# Altium PCB Power_Board-V1.0.PcbDoc (part 4 of 4)
Units mm, origin at the board's own origin, x right, y up, seen from the top; angles counter-clockwise.
Board outline 64.6 x 83.5 mm, 4 copper layers (Top Layer, GND1, GND2, Bottom Layer), stack 0.603 mm thick; 188 components, 131 nets, 487 pads, 123 vias.
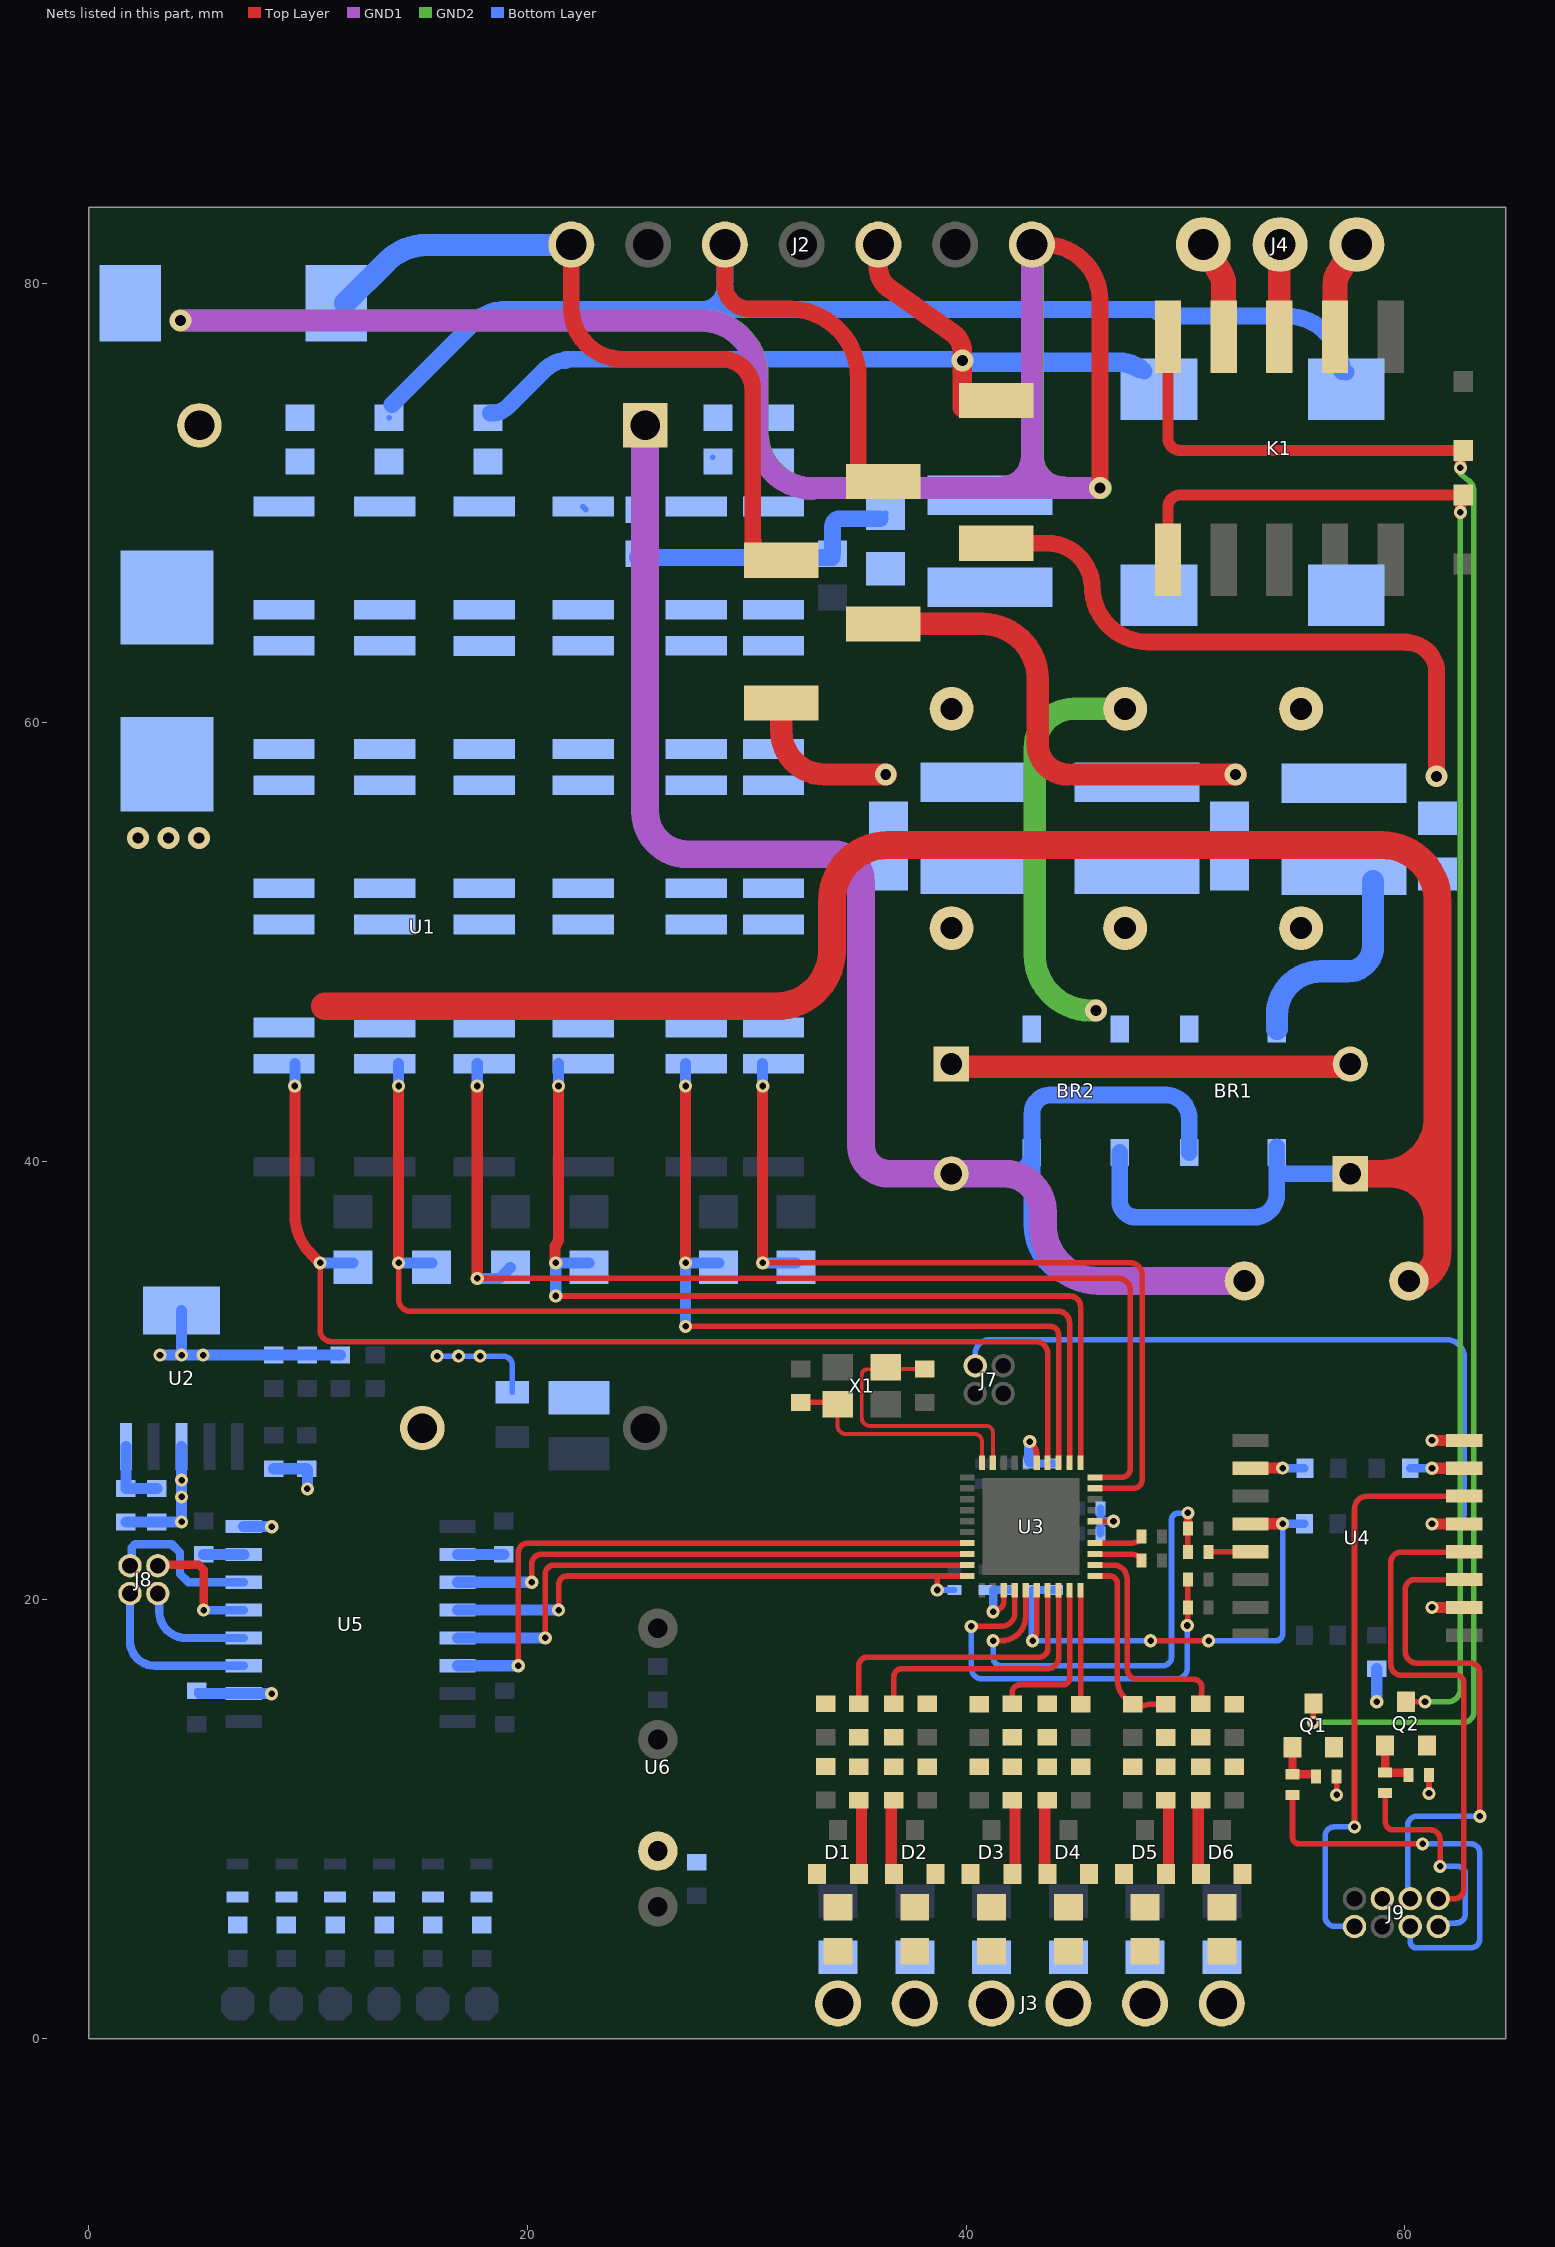
[diagram p4: the nets of this part, all layers, seen from the top]

## Via types
v1: diameter 0.6, hole 0.3, Top Layer to Bottom Layer, tented both sides, 113 vias
v2: diameter 1, hole 0.5, Top Layer to Bottom Layer, tented both sides, 10 vias

## Nets (pads, with @x,y where several pads share a name; then routed paths per layer and width w, separated by ;. In a path a pad name is that pad's centre, name@x,y a point inside that pad or via, vN(x,y) a via of type N, cw(c..) or ccw(c..) an arc to the next point about the centre after c; other vN are vias at no path point) (continued)
ADE_PM1: R15.1 U4.13 | length 1.9
  Top Layer w0.254: R15.1@51.052,22.178 cw(c51.071,22.178) 51.071,22.197 U4.13@52.96,22.197
AVDD: C34.2 C35.2 U3.25 | length 2.7
  Top Layer w0.254: v1@43.1,27.001 cw(c42.533,26.62) 43.216,26.62 U3.25@43.216,26.247
  Bottom Layer w0.381: C35.2@42.9,26.223 C34.2@43.997,26.223
  Bottom Layer w0.508: C35.2@42.899,26.357 v1(42.899,27.22)
COM: J4.2 K1.3 | length 3.9
  Top Layer w1.016: K1.3@54.279,77.823 J4.2@54.279,81.765
DVDD: C32.2 C33.2 U3.3 | length 3.1
  Top Layer w0.254: v1(41.231,19.46) 41.474,19.564 ccw(c41.319,19.929) 41.716,19.929 U3.3@41.716,20.432
  Bottom Layer w0.178: 41.231,20.401 cw(c41.284,20.401) 41.284,20.454
  Bottom Layer w0.381: v1(41.231,19.46) 41.231,20.401 41.231,20.464 41.96,20.464 C33.2@41.97,20.454
GND: C5.1 C6.1 C9.1 C10.1 C11.1 C12.1 C13.1 C14.1 C15.1 C30.1 C62.1 J9.3 Q1.2 Q2.2 R11.1 R90.1 R91.1 U1.3 U2.3 U2.6 U4.2 U4.8 U5.2 U5.8 U6.2 | length 34.5
  Top Layer w0.254: v1(56.89,11.112) R90.1@56.89,11.956 ; v1(61.102,11.18) R91.1@61.102,12.024
  Top Layer w0.508: v1(61.239,19.657) U4.2@62.71,19.657 ; v1(61.239,27.277) U4.8@62.71,27.277
  Bottom Layer w0.254: C30.1@4.92,15.854 ccw(c5.047,15.854) C30.1@5.047,15.727 ; U5.8@7.061,23.347 U5.8@7.065,23.344 ; v1@8.334,23.344 v1(8.338,23.34) ; v1@15.888,31.115 v1(16.859,31.115) ; v1@16.808,31.166 ccw(c16.859,31.166) v1(16.859,31.115) ; C5.1@19.304,29.464 19.304,30.705 ccw(c18.894,30.705) 18.894,31.115 v1(17.84,31.115) v1(16.859,31.115)
  Bottom Layer w0.508: C14.1@1.686,23.557 R11.1@3.098,23.557 v1(4.226,23.557) U2.3@4.226,26.996 ; v1(3.245,31.166) v1(4.226,31.166) ; U2.6@4.226,33.196 v1(4.226,31.166) ; C30.1@5.047,15.727 U5.2@7.061,15.727 v1@8.331,15.727 ; U5.8@7.065,23.344 v1@8.334,23.344 ; C13.1@8.424,25.981 C12.1@9.931,25.981 9.967,25.945 v1(9.967,25.062) ; C10.1@11.472,31.166 C11.1@9.948,31.166 C9.1@8.424,31.166 v1(5.207,31.166) v1(4.226,31.166) ; v1(58.724,15.357) C15.1@58.724,16.863
  other v1: 8.334,15.724 4.226,24.7 4.226,25.462 15.878,31.115
HV_DC: BR1.1 BR2.1 C2.1 C3.2 J1.2 | length 101.3
  Top Layer w0.254: C3.2@59.621,34.544 C3.2@60.188,34.544
  Top Layer w1.27: 10.769,47.069 31.343,47.069 ccw(c31.343,49.609) 33.883,49.609 ; 33.883,49.484 33.883,51.829 ; 33.883,51.879 cw(c36.423,51.879) 36.423,54.419 58.953,54.419 cw(c58.953,51.879) 61.493,51.879 ; C2.1@57.526,39.268 C2.1@57.513,39.433 58.953,39.433 ; C3.2@60.188,34.544 ccw(c60.188,35.85) 61.493,35.85 61.493,37.282 ; 61.493,51.829 61.493,41.973 ; 58.953,39.433 ccw(c58.953,41.973) 61.493,41.973 ; 58.953,39.433 59.342,39.433 cw(c59.342,37.282) 61.493,37.282 ; 61.493,37.282 61.493,41.973
  Bottom Layer w0.254: 54.168,39.457 ccw(c54.192,39.457) 54.192,39.433
  Bottom Layer w0.762: BR2.1@47,40.399 47,38.2 ccw(c47.75,38.2) 47.75,37.45 53.122,37.45 ccw(c53.122,38.496) 54.168,38.496 54.168,39.457 BR1.1@54.168,40.399 BR1.1@54.168,40.649 ; 54.192,39.433 C2.1@57.513,39.433
  other v2: 2.233,54.737 3.63,54.737 5.027,54.737
HVGND: BR1.4 BR2.4 C3.1 C7.2 U1.1 | length 94.9
  GND1 w1.27: U1.1@25.364,73.556 25.364,55.936 ccw(c27.301,55.936) 27.301,53.999 33.938,53.999 cw(c33.938,52.729) 35.208,52.729 35.208,40.703 ccw(c36.478,40.703) 36.478,39.433 41.742,39.433 cw(c41.742,37.675) 43.5,37.675 43.5,37.084 ccw(c46.04,37.084) 46.04,34.544 C3.1@52.963,34.544
  Bottom Layer w0.762: C7.2@39.321,39.433 42.034,39.433 ; 49.105,43.02 cw(c49.105,41.957) 50.168,41.929 BR1.4@50.168,40.399 ; 49.13,43.02 43.835,43.02 ccw(c43.835,42.185) 43,42.185 BR2.4@43,40.399 ; C3.1@52.963,34.544 45.54,34.544 cw(c45.54,37.084) 43,37.084 43,38.467 ; 42.034,39.433 ccw(c42.034,40.399) BR2.4@43,40.399 ; 42.034,39.433 cw(c42.034,38.467) 43,38.467 ; 43,38.467 BR2.4@43,40.399
IA_N: FB4.1 J3.2 R37.1
IA_P: FB2.1 J3.1 R30.2
IAN: C45.1 R39.2 U3.8 | length 12.3
  Top Layer w0.254: R39.2@36.707,15.263 36.707,16.5 cw(c37.07,16.5) 37.07,16.863 43.692,16.863 ccw(c43.692,17.386) 44.216,17.386 U3.8@44.216,20.432
IAP: C42.2 R29.2 U3.7 | length 13.4
  Top Layer w0.254: R29.2@35.107,15.263 35.107,17 cw(c35.503,17) 35.503,17.396 43.34,17.396 ccw(c43.34,17.772) 43.716,17.772 U3.7@43.716,20.432
IB_N: FB7.1 J3.4 R48.1
IB_P: FB5.1 J3.3 R47.2
IBN: C50.1 R50.2 U3.10 | length 5.2
  Top Layer w0.254: C50.1@45.216,15.249 U3.10@45.216,20.432
IBP: C48.2 R45.2 U3.9 | length 7.4
  Top Layer w0.254: R45.2@42.107,15.263 42.107,15.79 cw(c42.443,15.79) 42.443,16.126 44.408,16.126 ccw(c44.408,16.434) 44.716,16.434 U3.9@44.716,20.349
IC_N: FB11.1 J3.6 R60.1
IC_P: FB9.1 J3.5 R59.2
ICN: C55.1 R66.2 U3.12 | length 10.6
  Top Layer w0.254: U3.12@45.873,21.59 46.718,21.59 cw(c46.718,20.969) 47.339,20.969 47.339,16.866 ccw(c47.826,16.866) 47.826,16.379 50.369,16.379 50.371,16.379 cw(c50.37,16.001) 50.746,15.961 50.744,15.936 R66.2@50.707,15.263
ICP: C53.2 R58.2 U3.11 | length 8.8
  Top Layer w0.254: U3.11@45.873,21.09 46.542,21.09 cw(c46.542,20.737) 46.894,20.737 46.894,16.351 46.894,16.344 ccw(c47.976,16.334) 47.242,15.539 47.281,15.503 C53.2@47.976,15.252 ; C53.2@47.64,15.319 47.933,15.144 47.999,15.16 48.353,15.249 R58.2@49.107,15.25
IN_N: 
IN_P: 
INN: R79.1 U3.14 | length 2.3
  Top Layer w0.254: U3.14@45.873,22.59 46.079,22.59 46.831,22.59 47.551,22.59 ccw(c47.551,23.133) 47.891,22.709 R79.1@47.993,22.888
INP: R77.2 U3.13 | length 2.2
  Top Layer w0.254: U3.13@45.873,22.09 47.256,22.09 47.499,22.09 cw(c47.499,21.459) 47.891,21.953 R77.2@47.993,21.79
IRQ0: J9.2 U4.6 | length 26.7
  Top Layer w0.254: v1@57.708,9.673 57.708,24.142 cw(c58.303,24.142) 58.303,24.737 U4.6@62.71,24.737
  Bottom Layer w0.254: J9.2@57.708,5.111 56.804,5.121 56.792,5.122 cw(c56.802,5.549) 56.374,5.549 56.374,9.251 cw(c56.773,9.251) 56.773,9.649 v1(57.708,9.649)
MISO: U3.38 U5.11 | length 24.4
  Top Layer w0.254: v1(20.196,20.807) 20.196,21.637 cw(c20.649,21.637) 20.649,22.09 U3.38@40.058,22.09
  Bottom Layer w0.254: v1@20.069,20.807 ccw(c20.069,20.927) v1@20.189,20.927
  Bottom Layer w0.508: U5.11@16.811,20.807 v1@20.069,20.807
MOSI: U3.39 U5.13 | length 26.1
  Top Layer w0.254: v1(20.807,18.267) 20.807,21.176 cw(c21.221,21.176) 21.221,21.59 39.723,21.59
  Bottom Layer w0.508: U5.13@16.811,18.267 v1(20.807,18.267)
NC: J4.1 K1.2 | length 4.2
  Top Layer w1.143: K1.2@56.819,77.823 56.819,79.996 cw(c57.744,79.996) 56.937,80.448 57.743,81.798 ccw(c56.871,82.319) J4.1@57.744,81.8
NetBR1_2: BR1.2 C1.2 L1.2 R2.2 | length 9.8
  Bottom Layer w1.016: BR1.2@54.168,46.033 54.168,46.658 cw(c56.168,46.658) 56.168,48.658 57.404,48.658 ccw(c57.404,49.801) 58.547,49.801 L1.2@58.547,52.769
NetBR1_3: BR1.3 C4.2 L2.2 R5.2
NetBR2_2: BR2.2 C1.1 C4.1 C8.1 L4.2 R9.2 | length 18.8
  GND2 w1.016: v2(45.925,46.879) 45.665,46.879 cw(c45.665,49.419) 43.125,49.419 43.125,58.825 cw(c44.93,58.825) 44.93,60.63 C4.1@47.25,60.63
NetBR2_3: BR2.3 C8.2 L3.2 R8.2
NetC2_2: C2.2 C7.1 | length 17.3
  Top Layer w1.016: C7.1@39.946,44.308 C2.2@57.275,44.308
NetC14_2: C14.2 R11.2 U2.5 | length 3.3
  Bottom Layer w0.508: U2.5@1.686,26.996 C14.2@1.686,25.081 R11.2@3.098,25.081
NetC28_2: C28.2 U3.30 X1.3 | length 10.7
  Top Layer w0.178: X1.3@34.052,29.004 cw(c34.052,28.916) X1.3@34.14,28.916 34.135,28.916 34.135,27.943 ccw(c34.518,27.951) 34.515,27.568 40.387,27.568 cw(c40.387,27.239) 40.716,27.239 40.716,27.237 U3.30@40.716,26.247
  Top Layer w0.254: C28.2@32.447,29.004 X1.3@34.052,29.004
NetC29_2: C29.2 U3.29 X1.1 | length 12.8
  Top Layer w0.178: C29.2@38.114,30.528 36.428,30.528 cw(c36.428,30.616) X1.1@36.34,30.616 36.241,30.517 35.485,30.517 ccw(c35.485,30.272) 35.24,30.272 35.24,28.315 ccw(c35.617,28.315) 35.617,27.938 40.92,27.938 cw(c40.92,27.643) 41.216,27.644 41.216,27.64 U3.29@41.216,26.247
NetC41_2: C41.2 R28.2 R29.1
NetC44_1: C44.1 R38.2 R39.1
NetC47_2: C47.2 R44.2 R45.1
NetC49_1: C49.1 R49.2 R50.1
NetC52_2: C52.2 R57.2 R58.1
NetC54_1: C54.1 R65.2 R66.1
NetC58_2: 
NetC60_1: 
NetD1_1: D1.1 D1.2 FB2.2 R28.1 | length 3.4
  Top Layer w0.508: R28.1@35.107,10.868 35.23,10.746 D1.2@35.23,7.498
NetD2_1: D2.1 D2.2 FB4.2 R38.1 | length 3.2
  Top Layer w0.508: D2.1@36.585,7.498 R38.1@36.585,10.746
NetD3_1: D3.1 D3.2 FB5.2 R44.1 | length 3.2
  Top Layer w0.508: D3.2@42.23,7.498 R44.1@42.23,10.746
NetD4_1: D4.1 D4.2 FB7.2 R49.1 | length 3.2
  Top Layer w0.508: D4.1@43.584,7.498 R49.1@43.584,10.746
NetD5_1: D5.1 D5.2 FB9.2 R57.1 | length 3.2
  Top Layer w0.508: D5.2@49.23,7.498 R57.1@49.23,10.746
NetD6_1: D6.1 D6.2 FB11.2 R65.1 | length 3.2
  Top Layer w0.508: D6.1@50.585,7.498 R65.1@50.585,10.746
NetD7_1: 
NetD8_1: 
NetFB1_2: FB1.2 R23.1
NetFB3_2: FB3.2 R32.1
NetFB6_2: FB6.2 R40.1
NetFB8_2: FB8.2 R52.1 | length 0.2
  Bottom Layer w0.254: R52.1@22.518,69.85 R52.1@22.661,69.707
NetFB10_2: FB10.2 R61.1
NetFB12_2: FB12.2 R69.1 | length 0
NetJ1_1: J1.1 U1.2
NetL1_1: L1.1 R1.2 R2.1 | length 28.4
  Top Layer w0.762: R1.2@41.368,68.179 43.696,68.179 cw(c43.696,66.125) 45.75,66.125 45.75,66.015 ; 45.75,66.215 ccw(c48.29,66.215) 48.29,63.675 60.077,63.675 ; 60.077,63.65 cw(c60.077,62.264) 61.443,62.496 v2@61.443,57.53
  other v2: 61.447,57.555
NetL2_1: L2.1 R4.2 R5.1 | length 21
  Top Layer w1.016: R4.2@36.22,64.503 40.727,64.503 cw(c40.727,61.963) 43.267,61.963 43.267,59.01 ccw(c44.644,59.01) 44.644,57.633 ; 44.933,57.633 v2(52.29,57.633)
NetL3_1: L3.1 R7.2 R8.1 | length 6.9
  Top Layer w1.016: R7.2@31.571,60.625 31.571,59.605 ccw(c33.537,59.605) 33.537,57.64 36.334,57.64 v2(36.334,57.633)
NetLED1_1: LED1.1 R83.1
NetLED2_1: LED2.1 R84.1
NetLED3_1: LED3.1 R85.1
NetLED4_1: LED4.1 R86.1
NetLED5_1: LED5.1 R87.1
NetLED6_1: LED6.1 R88.1
NetQ1_1: Q1.1 R20.2 R90.2 | length 2.4
  Top Layer w0.381: Q1.1@54.88,13.281 R20.2@54.88,12.052 55.854,12.052 cw(c55.854,11.956) R90.2@55.95,11.956
NetQ2_1: Q2.1 R89.2 R91.2 | length 2.4
  Top Layer w0.381: Q2.1@59.104,13.357 R89.2@59.104,12.128 60.077,12.128 cw(c60.077,12.032) R91.2@60.173,12.032
NetR12_2: R12.2 R13.2 U3.4 | length 19.7
  Top Layer w0.254: v1(40.234,18.796) 41.605,18.796 ccw(c41.605,19.407) 42.216,19.407 U3.4@42.216,20.432 ; v1(50.079,18.835) 50.096,18.851 50.096,19.822 R13.2@50.109,19.835 ; R13.2@50.112,19.835 R12.2@50.112,20.924
  Bottom Layer w0.254: v1(40.234,18.796) 40.234,16.895 ccw(c40.72,16.895) 40.72,16.408 49.603,16.408 ccw(c49.603,16.885) 50.079,16.885 v1(50.079,18.835)
NetR14_2: R14.2 R15.2 U3.5 | length 21.6
  Top Layer w0.254: v1(41.231,18.136) 41.594,18.136 ccw(c41.594,19.258) 42.716,19.258 U3.5@42.716,20.432 ; R15.2@50.112,22.178 R14.2@50.112,23.264
  Top Layer w0.381: R14.2@50.112,23.267 v1(50.112,23.966)
  Bottom Layer w0.254: v1(41.231,18.136) 41.231,17.373 ccw(c41.6,17.373) 41.6,17.003 48.964,17.003 ccw(c48.964,17.401) 49.362,17.401 49.362,23.657 cw(c49.657,23.657) 49.657,23.952 50.112,23.952 v1(50.112,23.966)
NetR18_1: R18.1 U4.7 | length 2.5
  Top Layer w0.508: v1(61.239,26.007) U4.7@62.71,26.007
  Bottom Layer w0.381: R18.1@60.248,26.01 v1@61.239,26.01
NetR19_1: R19.1 U4.10 | length 2.5
  Top Layer w0.178: U4.10@52.96,26.007 U4.10@52.96,26.01
  Top Layer w0.508: U4.10@52.96,26.01 v1(54.431,26.01)
  Bottom Layer w0.381: v1(54.431,26.01) R19.1@55.422,26.01
NetR21_1: R21.1 U5.7 | length 1.8
  Bottom Layer w0.508: R21.1@5.232,22.077 U5.7@7.061,22.077
NetR22_1: R22.1 U5.10 | length 2.1
  Bottom Layer w0.508: U5.10@16.811,22.077 R22.1@18.923,22.077
NetR23_2: R23.2 R24.1
NetR24_2: R24.2 R25.1
NetR25_2: R25.2 R26.1
NetR32_2: R32.2 R33.1
NetR33_2: R33.2 R34.1
NetR34_2: R34.2 R35.1
NetR40_2: R40.2 R41.1
NetR41_2: R41.2 R42.1
NetR42_2: R42.2 R43.1
NetR52_2: R52.2 R53.1
NetR53_2: R53.2 R54.1
NetR54_2: R54.2 R55.1
NetR61_2: R61.2 R62.1
NetR62_2: R62.2 R63.1
NetR63_2: R63.2 R64.1
NetR69_2: R69.2 R70.1
NetR70_2: R70.2 R71.1
NetR71_2: R71.2 R72.1
NEUTRAL: FB3.1 FB8.1 FB12.1 FB15.1 J2.1 L4.1 R9.1 VR1.1 VR2.1 VR3.1 | length 152.6
  Top Layer w0.762: J2.1@43,81.8 J2.1@43.56,81.8 ; J2.1@43.81,81.8 J2.1@43.56,81.8 ; v2(46.1,70.696) 46.1,79.26 ccw(c43.56,79.26) J2.1@43.56,81.8
  GND1 w1.016: v2@4.405,78.334 26.8,78.334 27.916,78.334 cw(c27.916,75.794) 30.456,75.794 30.456,73.065 ; 30.456,73.215 ccw(c32.996,73.215) 32.996,70.675 ; 32.571,70.7 v2@46.1,70.7 ; 41.587,70.719 ccw(c41.587,72.132) 43,72.132 ; 43,70.8 43,72.132 ; J2.1@43,81.8 43,72.132 ; 44.413,70.719 cw(c44.413,72.132) 43,72.132
  GND2 w1.016: v2@4.439,78.334 26.833,78.334 27.95,78.334 cw(c27.95,75.794) 30.49,75.794 30.49,73.065 ; 30.49,73.215 ccw(c33.03,73.215) 33.03,70.675 ; 32.605,70.7 v2@46.134,70.7 ; 41.621,70.719 ccw(c41.621,72.132) 43.034,72.132 ; 43.034,70.8 43.034,72.132 ; J2.1@43.034,81.8 43.034,72.132 ; 44.447,70.719 cw(c44.447,72.132) 43.034,72.132
  Bottom Layer w0.254: R9.1@36.08,69.3 ccw(c36.08,69.548) R9.1@36.328,69.548
  Bottom Layer w0.762: FB8.1@25.019,67.532 FB15.1@33.879,67.532 ; FB15.1@33.908,67.703 33.908,68.958 cw(c34.25,68.958) 34.25,69.3 R9.1@36.08,69.3
  other v2: 4.18,78.334
NO: J4.3 K1.4 | length 4.2
  Top Layer w1.143: J4.3@50.814,81.8 ccw(c51.687,82.319) 50.815,81.798 51.621,80.448 cw(c50.814,79.996) 51.739,79.996 K1.4@51.739,77.823
PM0: J9.5 U4.3 | length 23.2
  Top Layer w0.254: U4.3@62.71,20.927 62.71,20.93 60.46,20.93 ccw(c60.46,20.494) 60.024,20.494 60.024,17.64 ccw(c60.543,17.64) 60.543,17.12 62.995,17.12 cw(c62.995,16.691) 63.424,16.691 v1(63.424,10.135)
  Bottom Layer w0.254: J9.5@60.248,6.381 60.128,6.501 60.128,9.687 cw(c60.554,9.709) 60.554,10.135 v1(63.424,10.135)
PM1: J9.7 U4.4 | length 23
  Top Layer w0.254: J9.7@61.518,6.381 62.258,6.381 62.343,6.381 ; 62.258,6.373 ccw(c62.258,6.805) 62.69,6.805 62.69,16.228 ccw(c62.358,16.228) 62.358,16.561 59.852,16.561 cw(c59.852,17.048) 59.365,17.048 59.365,21.718 cw(c59.821,21.718) 59.821,22.174 62.687,22.174 ccw(c62.687,22.197) U4.4@62.71,22.197
REF: C36.2 C37.2 U3.16 | length 2.6
  Top Layer w0.254: U3.16@45.873,23.59 v1(46.718,23.59)
  Bottom Layer w0.254: C37.2@46.127,24.17 C37.2@46.13,24.17
  Bottom Layer w0.381: C36.2@46.127,23.027 46.127,23.599 ; C37.2@46.127,24.17 46.127,23.599 ; v1(46.718,23.59) 46.718,23.599 46.127,23.599
RESET: J7.2 U4.5 | length 34.2
  Top Layer w0.508: v1@61.239,23.463 U4.5@62.71,23.463
  Bottom Layer w0.254: J7.2@40.414,30.463 40.414,31.214 cw(c41.063,31.214) 41.063,31.863 61.91,31.863 cw(c61.91,31.061) 62.713,31.061 62.713,23.978 cw(c62.195,23.978) 62.195,23.46 61.239,23.46 v1(61.239,23.467)
RESET_ADE: C21.2 R16.1 SB1.2 U3.6 U4.12 | length 24.8
  Top Layer w0.178: U4.12@52.96,23.467 U4.12@52.96,23.47
  Top Layer w0.254: v1(43.028,18.136) ccw(c42.576,18.588) 43.216,18.588 U3.6@43.216,20.432 ; v1(48.412,18.136) v1(51.052,18.136)
  Top Layer w0.508: U4.12@52.96,23.47 v1(54.431,23.47)
  Bottom Layer w0.178: v1(43.028,18.136) v1@43.037,18.136
  Bottom Layer w0.254: v1@43.037,18.136 v1(48.412,18.136) ; v1(51.052,18.136) 54.116,18.136 ccw(c54.116,18.451) 54.431,18.451 v1(54.431,23.47) ; SB1.2@55.422,23.467 SB1.2@55.422,23.47
  Bottom Layer w0.381: v1@43.037,18.136 C21.2@43.037,20.454 R16.1@44.101,20.454 ; v1(54.431,23.47) SB1.2@55.422,23.47
RLY_RSET: J9.8 R89.1 | length 10.2
  Top Layer w0.254: R89.1@59.104,11.189 59.104,9.888 ccw(c59.477,9.888) 59.477,9.515 61.161,9.515 cw(c61.161,9.068) 61.608,9.068 v1(61.608,7.852)
  Bottom Layer w0.254: J9.8@61.518,5.111 61.674,5.267 62.344,5.267 ; v1(61.608,7.852) 62.404,7.852 cw(c62.404,7.493) 62.763,7.493 62.763,5.686 ; 62.345,5.269 ccw(c62.345,5.685) 62.762,5.685
RLY_SET: J9.6 R20.1 | length 19
  Top Layer w0.254: R20.1@54.88,11.112 54.88,9.185 ccw(c55.187,9.185) 55.049,8.911 ccw(c55.187,9.185) 55.187,8.878 v1(60.809,8.878)
  Bottom Layer w0.254: J9.6@60.248,5.111 60.248,4.416 ccw(c60.523,4.416) 60.523,4.14 63.01,4.14 ccw(c63.01,4.549) 63.419,4.549 ; v1(60.809,8.878) 63.006,8.878 cw(c63.006,8.461) 63.424,8.461 63.424,4.572
RSET_COIL: D10.1 K1.6 Q2.3 | length 73
  Top Layer w0.254: Q2.3@60.054,15.357 v1(60.921,15.357)
  Top Layer w0.508: K1.6@49.199,67.43 49.199,69.811 cw(c49.767,69.811) 49.767,70.379 D10.1@62.532,70.379 ; v1(62.532,69.592) D10.1@62.532,70.343
  GND2 w0.254: v1(60.921,15.357) 61.952,15.357 ccw(c61.952,15.936) 62.532,15.936 v1@62.532,69.317
SCLK: U3.37 U5.14 | length 28.7
  Top Layer w0.254: v1(19.579,16.997) 19.585,16.997 19.585,22.167 cw(c20.008,22.167) 20.008,22.59 U3.37@40.058,22.59
  Bottom Layer w0.508: U5.14@16.811,16.997 v1(19.579,16.997)
SET_COIL: D9.1 K1.5 Q1.3 | length 84.3
  Top Layer w0.254: Q1.3@55.83,15.281 55.835,15.276 v1(55.835,14.417)
  Top Layer w0.508: K1.5@49.199,77.59 49.199,72.984 ccw(c49.773,72.984) 49.773,72.41 D9.1@62.67,72.41 ; v1(62.532,71.623) D9.1@62.532,72.374
  GND2 w0.254: v1(55.835,14.417) 62.672,14.417 ccw(c62.672,14.896) 63.152,14.896 63.152,70.179 63.152,70.547 ccw(c62.532,70.547) 62.922,71.029 v1@62.532,71.348
SPI_MISO: J8.3 U5.6 | length 7.3
  Bottom Layer w0.381: J8.3@1.876,21.562 1.961,21.646 1.961,22.387 2.114,22.54 3.779,22.54 4.155,22.164 4.155,21.185 4.533,20.807 U5.6@7.061,20.807
SPI_MOSI: J8.2 U5.4 | length 5.4
  Bottom Layer w0.381: J8.2@3.146,20.292 3.205,20.233 3.205,19.487 ccw(c4.425,19.487) 4.425,18.267 U5.4@7.061,18.267
SPI_SCK: J8.1 U5.3 | length 8.3
  Bottom Layer w0.381: J8.1@1.876,20.584 1.876,18.127 ccw(c3.006,18.127) 3.006,16.997 U5.3@7.061,16.997
SPI_SS: J8.4 U5.5 | length 5.8
  Top Layer w0.381: J8.4@3.225,21.612 5.009,21.612 5.232,21.389 v1(5.232,19.537)
  Bottom Layer w0.381: v1(5.232,19.537) U5.5@7.061,19.537
SS: R17.1 U3.40 U5.12 | length 26.1
  Top Layer w0.254: v1(21.419,19.537) 21.419,20.702 cw(c21.807,20.702) 21.807,21.09 38.684,21.09 U3.40@40.058,21.09 ; v1(38.684,20.454) 38.684,21.066
  Bottom Layer w0.254: v1(38.684,20.454) R17.1@39.474,20.454
  Bottom Layer w0.508: U5.12@16.811,19.537 v1@21.445,19.537
VA_INPUT: FB1.1 J2.3 R1.1 VR1.2 | length 40.1
  Top Layer w0.762: 36,80.739 J2.3@36,81.8 ; v2(39.828,76.516) v2@39.828,76.842
  Top Layer w0.889: 36,80.714 36,80.739 ccw(c37.131,80.739) 36.479,79.815 39.349,77.791 cw(c38.697,76.867) v2@39.828,76.867 ; R1.1@39.828,74.351 v2(39.828,76.516)
  Bottom Layer w0.762: FB1.1@18.302,74.106 18.479,74.115 ccw(c18.337,75.237) 19.135,74.435 20.798,76.098 cw(c21.595,75.296) 21.001,76.258 21.146,76.347 cw(c21.74,75.385) 21.74,76.516 ; 21.74,76.566 v2@39.828,76.566 ; VR1.2@47.887,76.222 VR1.2@48.125,76.025
  Bottom Layer w0.889: v2@39.828,76.441 46.94,76.441 cw(c46.94,74.765) VR1.2@47.887,76.147
VA_N: C43.2 R35.2 R36.2 U3.19 | length 39.9
  Top Layer w0.254: v1(30.723,35.368) 47.474,35.368 cw(c47.474,34.812) 48.031,34.812 48.031,25.5 cw(c47.621,25.5) 47.621,25.09 U3.19@45.873,25.09
  Top Layer w0.508: v1(30.723,35.368) v1(30.723,43.434)
  Bottom Layer w0.508: v1@30.723,35.367 C43.2@32.233,35.367 ; v1(30.723,43.434) R36.2@30.723,44.45
VA_P: C40.2 R26.2 R27.2 U3.20 | length 51.5
  Top Layer w0.254: v1(17.706,34.661) 46.943,34.661 cw(c46.943,34.116) 47.488,34.116 47.488,26.007 cw(c47.071,26.007) 47.071,25.59 U3.20@45.873,25.59
  Top Layer w0.508: v1@17.706,34.712 v1(17.706,43.434)
  Bottom Layer w0.508: v1(17.706,34.661) 18.713,34.661 C40.2@19.216,35.164 ; v1(17.706,43.434) R27.2@17.706,44.449
VB_INPUT: FB6.1 J2.5 R4.1 VR2.2 | length 66.7
  Top Layer w0.762: 28.987,79.969 28.987,79.994 ; J2.5@28.987,81.787 28.987,79.994 ; 31.919,78.863 cw(c31.919,75.697) 35.085,75.697 ; 32.016,78.863 30.118,78.863 cw(c30.118,79.994) 28.987,79.994 ; R4.1@35.085,71.425 35.085,75.524
  Bottom Layer w0.762: 13.818,74.503 17.588,78.274 cw(c18.95,76.911) 18.95,78.838 ; 18.825,78.838 27.94,78.838 ; 29,80.123 J2.5@29,81.8 ; VR2.2@57.137,75.998 ccw(c54.597,75.998) 54.597,78.538 49.275,78.538 cw(c49.275,79.494) 48.599,78.818 ccw(c48.551,78.77) 48.551,78.838 30.06,78.838 ; VR2.2@57.137,76.298 57.137,76.157 VR2.2@57.328,75.972 ; 27.94,78.838 ccw(c27.94,79.898) 29,79.898 ccw(c30.06,79.898) 30.06,78.838 ; 27.94,78.838 30.06,78.838
VB_N: C51.2 R55.2 R56.2 U3.21 | length 43.5
  Top Layer w0.254: v1(21.287,33.858) 44.726,33.858 cw(c44.726,33.368) 45.216,33.368 U3.21@45.216,26.247
  Top Layer w0.508: v1(21.287,35.369) cw(c21.377,35.459) 21.25,35.459 21.25,36.125 ccw(c20.858,36.517) 21.412,36.517 v1(21.412,43.434)
  Bottom Layer w0.508: v1(21.287,33.858) v1(21.287,35.369) C51.2@22.797,35.369 ; v1(21.412,43.434) R56.2@21.412,44.449
VB_P: C46.2 R43.2 R46.2 U3.22 | length 49.8
  Top Layer w0.254: v1(14.123,35.369) 14.123,33.715 ccw(c14.678,33.715) 14.678,33.161 44.198,33.161 cw(c44.198,32.643) 44.716,32.643 U3.22@44.716,26.247
  Top Layer w0.508: v1(14.123,35.369) v1(14.123,43.434)
  Bottom Layer w0.508: v1(14.123,35.369) C46.2@15.634,35.369 ; v1(14.123,43.434) R46.2@14.123,44.449
VC_INPUT: FB10.1 J2.7 R7.1 VR3.2 | length 33.3
  Top Layer w0.762: J2.7@22,81.8 22,78.916 ccw(c24.349,78.916) 24.349,76.568 28.878,76.568 cw(c28.878,75.175) 30.27,75.176 ; 30.27,75.174 30.271,72.504 30.271,68.478 ccw(c31.571,68.478) R7.1@31.571,67.178
  Bottom Layer w1.016: VR3.2@11.685,79.121 13.594,81.03 cw(c15.39,79.234) 15.39,81.774 J2.7@21.974,81.774
VC_N: C57.2 R72.2 R73.2 U3.23 | length 36.5
  Top Layer w0.254: v1(27.208,32.471) 43.823,32.471 ; 43.824,32.471 cw(c43.826,32.081) 44.216,32.081 U3.23@44.216,26.247
  Top Layer w0.508: v1(27.208,35.368) v1(27.208,43.434)
  Bottom Layer w0.508: v1@27.208,32.547 v1(27.208,35.368) C57.2@28.718,35.368 ; v1(27.208,43.434) R73.2@27.208,44.449
VC_P: C56.2 R64.2 R67.2 U3.24 | length 52.8
  Top Layer w0.254: v1(10.541,35.369) 10.541,32.296 ccw(c11.057,32.296) 11.057,31.781 43.18,31.781 cw(c43.18,31.245) 43.716,31.245 U3.24@43.716,26.247
  Top Layer w0.508: v1(9.391,43.434) 9.391,37.571 ccw(c11.931,37.571) 10.135,35.775 v1(10.541,35.369)
  Bottom Layer w0.508: v1(9.391,43.434) R67.2@9.391,44.449 ; v1(10.541,35.369) C56.2@12.051,35.369
pads on no net: J2.2 J2.4 J2.6 J7.1 J7.4 J9.4 K1.7 K1.8 K1.9

## Polygon pours and split planes (outlines as drawn)
GND on GND1 "NONET_L-01_P-001" (solid, pour order 1): 64.6,31.93 56.896,31.93 56.896,17.726 18.288,17.726 18.288,31.93 0,31.93 0,25.084 0,25.025 0,0 64.6,0
AD_GND on GND1 "NONET_L-01_P-001" (solid, pour order 2): 18.923,18.288 56.204,18.288 56.204,31.93 31.7,31.93 31.7,40.85 18.923,40.85
NEUTRAL on Bottom Layer "NEUTRAL_L04_P017" (solid, remove dead copper, pour order 17): 37.45,74.55 45.327,70.942 37.45,70.942
AD_GND on Bottom Layer "NONET_L-01_P-001" (solid, remove dead copper, pour order 9): 28.135,15.95 24.125,15.95 24.125,25.6 0,25.6 0,0 64.6,0 64.6,31.863 36.075,31.863 36.075,40.2 29.102,40.2 29.102,36.943 34.544,36.943 34.544,33.528 28.135,33.528
GND on Bottom Layer "NONET_L-01_P-001" (solid, pour order 8): 6.26,34.296 0,34.296 0,13.949 9.275,13.949 9.275,31.93 6.26,31.93
AD_GND on Top Layer "NONET_L-01_P-001" (solid, remove dead copper, pour order 11): 0,31.781 64.6,31.781 64.6,0 0,0 0,-0.127
5VDC on Top Layer "NONET_L-01_P-001" (solid, pour order 10): 28.458,7.239 28.458,3.655 5.461,3.655 5.461,14.457 14.714,14.457 14.714,29.718 28.135,29.718 28.135,25.806 18.851,25.806 18.851,10.835 9.508,10.835 9.508,7.239 25.781,7.239
AD_GND on GND2 "NONET_L-01_P-001" (solid, remove dead copper, pour order 16): 0,32.053 0,0 64.6,0 64.6,32.053
5VDC on GND2 "NONET_L-01_P-001" (solid, remove dead copper, pour order 12): 24.003,7.747 58.448,7.747 58.448,3.175 24.003,3.175
3V3DC on GND2 "NONET_L-01_P-001" (solid, pour order 15): 43.716,32.893 43.716,28.598 18.742,28.598 18.742,30.48 7.112,30.48 7.112,32.893
3V3-ISO on GND2 "NONET_L-01_P-001" (solid, remove dead copper, pour order 14): 18.742,17.55 37.024,17.55 37.024,21.844 58.166,21.844 58.166,28.244 18.742,28.244
+3V3 on GND2 "NONET_L-01_P-001" (solid, pour order 13): 7.112,30.023 18.288,30.023 18.288,16.997 37.592,16.997 37.592,21.457 47.339,21.457 47.339,12.629 7.112,12.629

## Other copper
Top Layer:
  rectangle net AD_GND: 13.593,30.246 19.24,30.55
  rectangle net AD_GND: 44.772,13.344 48.043,14.119
  rectangle net AD_GND: 44.772,9.046 48.043,11.262
  rectangle net AD_GND: 46.017,10.487 46.797,13.817
  rectangle net AD_GND: 37.771,13.345 41.043,14.119
  rectangle net AD_GND: 37.771,9.046 41.043,11.262
  rectangle net AD_GND: 39.017,10.488 39.797,13.818
  rectangle net GND: 60.874,11.706 61.331,13.349
  rectangle net GND: 56.661,11.639 57.118,13.281
  rectangle net ICN: 50.263,14.882 52.66,15.644
  rectangle net ICP: 47.154,14.868 49.552,15.63
  rectangle net IBN: 43.262,14.882 45.66,15.644
  rectangle net IBP: 40.154,14.869 42.552,15.631
  rectangle net IAN: 36.263,14.882 38.66,15.644
  rectangle net IAP: 33.154,14.882 35.552,15.644
  region net NetC44_1: 37.152,14.106 36.263,14.106 36.263,11.998 37.152,11.998
  region net NetC44_1: 38.66,12.773 36.263,12.773 36.263,11.998 38.66,11.998
  region net NetC49_1: 44.151,14.106 43.262,14.106 43.262,11.998 44.151,11.998
  region net NetC49_1: 45.66,12.773 43.262,12.773 43.262,11.998 45.66,11.998
  region net NetC54_1: 51.152,14.106 50.263,14.106 50.263,11.998 51.152,11.998
  region net NetC54_1: 52.66,12.773 50.263,12.773 50.263,11.998 52.66,11.998
  rectangle net NetC52_2: 48.663,11.998 49.552,14.106
  rectangle net NetC52_2: 47.154,11.998 49.552,12.773
  rectangle net NetC47_2: 41.663,11.999 42.552,14.107
  rectangle net NetC47_2: 40.154,11.999 42.552,12.774
  rectangle net NetC41_2: 33.154,12.011 35.552,12.786
  rectangle net NetC41_2: 34.663,12.011 35.552,14.12
  rectangle net NetD6_1: 50.297,7.046 53.017,7.966
  rectangle net NetD6_1: 50.997,5.385 52.317,7.719
  rectangle net NetD5_1: 46.797,7.046 49.517,7.966
  rectangle net NetD5_1: 47.497,5.385 48.817,7.719
  rectangle net NetD4_1: 43.297,7.046 46.017,7.966
  rectangle net NetD4_1: 43.997,5.385 45.317,7.719
  rectangle net NetD3_1: 39.797,7.046 42.517,7.966
  rectangle net NetD3_1: 40.497,5.385 41.817,7.719
  rectangle net NetD2_1: 36.297,7.046 39.017,7.966
  rectangle net NetD2_1: 36.997,5.385 38.317,7.719
  rectangle net NetD1_1: 33.497,5.385 34.817,7.719
  rectangle net NetD1_1: 32.797,7.046 35.517,7.966
  rectangle net IC_N: 50.997,1.6 52.317,4.585
  rectangle net IC_P: 47.497,1.6 48.817,4.585
  rectangle net IB_N: 43.997,1.6 45.317,4.585
  rectangle net IB_P: 40.497,1.6 41.817,4.585
  rectangle net IA_N: 36.997,1.6 38.317,4.585
  rectangle net IA_P: 33.497,1.6 34.817,4.585
  region net HV_DC: 13.094,47.698 7.048,47.698 cw(c7.048,49.074) 5.672,49.081 5.711,55.952 1.4,55.952 1.4,46.456 13.094,46.456 13.094,47.729
Bottom Layer:
  rectangle net NEUTRAL: 35.439,71.278 37.6,74.504
  rectangle net NetJ1_1: 1.475,72.103 6.207,74.703
  rectangle net NetJ1_1: 1.475,63.552 5.65,74.703
  rectangle net NetFB6_2: 13.033,69.674 14.353,71.928
  rectangle net NetR40_2: 12.54,63.4 14.473,65.05
  rectangle net NetBR2_2: 35.722,59.669 56.45,62.257
  rectangle net NetBR1_2: 53.678,45.336 54.769,46.933
  rectangle net NetBR2_2: 45.375,45.416 47.42,47.416
  rectangle net HV_DC: 53.748,38.225 58.55,41.016
  rectangle net NEUTRAL: 0.885,77.371 4.8,80.871
  rectangle net NetBR1_2: 54.371,52.181 62.382,53.981
  rectangle net VC_INPUT: 8.975,73.503 10.295,80.871
  rectangle net NEUTRAL: 35.439,68.786 43.941,71.429
  rectangle net NEUTRAL: 47.071,65.553 59.078,71.278
  rectangle net NEUTRAL: 35.439,68.786 59.078,71.278
  rectangle net NEUTRAL: 48.26,64.425 57.785,68.353
  rectangle net GND: 4.611,25.344 7.979,25.569
  rectangle net AD_GND: 7.475,36.943 34.544,40.199
  rectangle net AD_GND: 31.462,5.493 54.468,11.436
  rectangle net AD_GND: 42.488,21.971 45.418,25.512
  rectangle net AD_GND: 40.414,21.165 43.354,25.508
  rectangle net GND: 18.542,28.956 23.749,29.972
  region net AD_GND: 26.388,15.824 25.499,15.824 25.499,13.699 26.388,13.699
  rectangle net 3V3-ISO: 25.499,16.586 26.388,18.711
  rectangle net GND: 25.944,7.658 28.156,8.42
  rectangle net 5VDC: 25.944,6.134 28.156,6.896
  rectangle net 5VDC: 5.496,26.106 6.766,27.886
  rectangle net 5VDC: 6.491,26.744 10.375,28.071
  region net NetLED4_1: 18.352,6.461 17.463,6.461 17.463,5.179 18.352,5.179
  region net NetLED3_1: 16.127,6.461 15.238,6.461 15.238,5.179 16.127,5.179
  region net NetLED2_1: 13.902,6.461 13.013,6.461 13.013,5.179 13.902,5.179
  region net NetLED1_1: 11.677,6.461 10.788,6.461 10.788,5.179 11.677,5.179
  region net NetLED5_1: 7.227,6.461 6.338,6.461 6.338,5.179 7.227,5.179
  region net NetLED6_1: 9.452,6.461 8.563,6.461 8.563,5.179 9.452,5.179
  rectangle net HV_DC: 1.449,53.823 5.689,60.252
  region net NetBR1_3: 50.758,53.081 49.748,53.081 49.748,45.416 50.758,45.416
  rectangle net NetBR2_3: 42.335,45.416 43.42,53.4
  rectangle net NetBR1_3: 46.25,50.88 48.25,53.721
  rectangle net NetBR2_3: 35.572,52.432 43.61,53.982
  region net NetL3_1: 43.61,58.182 35.524,58.182 35.524,54.878 43.61,54.878
  rectangle net NetBR2_2: 35.439,59.669 44.05,67.925
  rectangle net NetL1_1: 54.221,54.877 62.382,58.139
  rectangle net NetL2_1: 44.831,54.877 52.894,58.181
  rectangle net NetBR1_2: 54.27,50.88 56.27,53.939
  rectangle net NetBR2_3: 38.334,50.88 40.334,53.721
  rectangle net NetBR1_3: 44.908,52.181 52.894,53.981
  rectangle net NetFB12_2: 28.029,69.85 29.098,72.104
  rectangle net NetFB1_2: 17.54,69.849 18.86,72.103
  rectangle net NetR69_2: 26.75,63.5 28.682,65.15
  rectangle net NetR70_2: 26.75,57.15 28.682,58.8
  rectangle net VC_N: 26.75,44.45 28.682,46.1
  rectangle net NetR71_2: 26.75,50.8 28.682,52.45
  rectangle net NetR24_2: 17.073,57.149 19.006,58.799
  rectangle net NetR23_2: 17.073,63.499 19.006,65.149
  rectangle net NetR25_2: 17.073,50.799 19.006,52.449
  rectangle net VA_P: 17.073,44.449 19.006,46.099
  rectangle net NEUTRAL: 28.029,73.304 37.528,74.504
  rectangle net NetFB3_2: 30.836,69.85 32.156,72.104
  rectangle net NetR33_2: 30.264,57.15 32.197,58.8
  rectangle net NetR32_2: 30.264,63.5 32.197,65.15
  rectangle net NetR34_2: 30.264,50.8 32.197,52.45
  rectangle net VA_N: 30.264,44.45 32.197,46.1
  rectangle net NetFB8_2: 21.198,69.4 25.679,70.3
  rectangle net NetFB10_2: 8.975,69.849 10.295,72.103
  rectangle net VB_N: 21.504,44.45 23.437,46.1
  rectangle net VB_P: 12.54,44.45 14.473,46.1
  rectangle net VC_P: 7.983,44.45 9.915,46.1
  rectangle net NetR63_2: 8.008,50.8 9.94,52.45
  rectangle net NetR42_2: 12.54,50.8 14.473,52.45
  rectangle net NetR54_2: 21.504,50.8 23.437,52.45
  rectangle net NetR53_2: 21.529,57.15 23.462,58.8
  rectangle net NetR41_2: 12.54,57.15 14.473,58.8
  rectangle net NetR62_2: 7.983,57.15 9.915,58.8
  rectangle net NetR52_2: 21.604,63.5 23.537,65.15
  rectangle net NetR61_2: 7.983,63.5 9.915,65.15
  rectangle net IC_N: 50.768,1.6 52.546,4.477
  rectangle net IC_P: 47.268,1.6 49.046,4.477
  rectangle net IB_N: 43.768,1.6 45.546,4.477
  rectangle net IB_P: 40.268,1.6 42.046,4.477
  rectangle net IA_N: 36.768,1.6 38.546,4.477
  rectangle net IA_P: 33.268,1.6 35.046,4.477
  region net 3V3-ISO: 27.225,16.586 24.384,16.586 24.384,23.047 18.288,23.047 18.288,23.994 15.605,23.994 15.39,23.994 15.373,23.991 15.048,23.948 14.729,23.816 14.455,23.606 14.245,23.332 14.113,23.013 14.07,22.688 14.067,22.671 14.067,16.397 14.07,16.379 14.113,16.056 14.244,15.739 14.453,15.466 14.726,15.257 15.043,15.126 15.366,15.083 15.384,15.08 15.605,15.08 18.826,15.08 19.397,15.08 19.397,13.716 12.905,13.716 12.905,25.202 27.225,25.202
  region net 5VDC: 27.225,25.6 10.77,25.6 10.77,26.744 9.486,26.744 9.486,28.071 13.882,28.071 13.935,28.003 13.935,27.669 14.021,27.346 14.189,27.057 14.425,26.82 14.714,26.653 15.037,26.567 15.371,26.567 15.694,26.653 15.983,26.82 16.219,27.057 16.387,27.346 16.473,27.669 16.473,28.003 16.526,28.071 24.13,28.071 24.13,29.972 27.225,29.972
  region net GND: 23.749,28.448 17.706,28.448 17.706,30.535 13.882,30.535 13.882,31.93 23.749,31.93
  region net GND: 6.26,31.93 12.285,31.93 12.285,30.535 2.356,30.535 2.356,34.296 6.26,34.296
  region net +3V3: 17.33,28.374 16.358,28.374 16.219,28.615 15.983,28.851 15.694,29.018 15.371,29.105 15.037,29.105 14.714,29.018 14.425,28.851 14.189,28.615 14.05,28.374 3.537,28.374 3.537,25.921 2.356,25.921 2.356,30.276 17.33,30.276

## Silkscreen, mask and mechanical layers (free items; w line width, h text height)
Top Overlay:
  lines w0.178: 33.065,16.279 53.76,16.279 53.76,6.911 ; 7.061,6.541 23.165,6.541 23.165,14.707 7.061,14.707 7.061,6.541
  text "L3" at 34.984,78.224 h2.54
  text "L1" at 20.984,78.194 h2.54
  text "L2" at 27.984,78.194 h2.54
  text "N" at 42.512,78.175 h2.54
  text "#1" at 33.063,16.677 h0.76
  text "#1" at 7.142,5.332 h0.76
Bottom Overlay:
  lines w0.178: 5.564,5.636 5.564,2.87 5.971,2.87 ; 18.72,2.87 19.126,2.87 19.126,5.636 ; 19.126,4.253 20.879,4.253 ; 24.841,5.08 20.879,5.08 20.879,1.803 29.409,1.803 29.409,5.111 27.178,5.111
Dimensions:
  drawing of 14412 lines, arcs and shapes, not listed
  text "12" at 324.327,400.737 h2.65
  text "11" at 373.827,400.737 h2.65
  text "10" at 423.327,400.737 h2.65
  text "9" at 472.854,400.737 h2.65
  text "8" at 522.354,400.737 h2.65
  text "7" at 571.854,400.737 h2.65
  text "6" at 621.354,400.737 h2.65
  text "5" at 670.854,400.737 h2.65
  text "4" at 720.354,400.737 h2.65
  text "3" at 769.854,400.737 h2.65
  text "2" at 819.354,400.737 h2.65
  text "1" at 868.854,400.737 h2.65
  text "H" at 302.124,376.987 h2.65
  text "H" at 891.124,376.987 h2.65
  text "A" at 346.074,372.886 h5.29
  text "G" at 302.121,324.487 h2.65
  text "G" at 891.121,324.487 h2.65
  text "F" at 302.102,271.987 h2.65
  text "F" at 891.102,271.987 h2.65
  text "A" at 345.993,270.495 h5.29
  text "E" at 302.136,219.487 h2.65
  text "E" at 891.136,219.487 h2.65
  text "D" at 302.099,166.987 h2.65
  text "D" at 891.099,166.987 h2.65
  text "C" at 302.103,114.487 h2.65
  text "C" at 891.103,114.487 h2.65
  text "B" at 302.111,61.987 h2.65
  text "B" at 891.111,61.987 h2.65
  text "General information:" at 677.328,21.144 h2.65
  text "-      Workpiece zero point for mechanical" at 677.328,16.616 h2.65
  text "processing" at 677.328,12.088 h2.65
  text "A" at 302.023,9.487 h2.65
  text "A" at 891.023,9.487 h2.65
  text "- Minimum recommended radius for" at 677.328,7.56 h2.65
  text "machining = R1.0 mm" at 677.328,3.032 h2.65
  text "- Mounting rail like EN 60715: TH 35-7.5 or TH 35-15" at 677.328,-1.495 h2.65
  text "- Recommended PCB outline on www.italtronic.com" at 677.328,-6.023 h2.65
  text "12" at 324.327,-14.263 h2.65
  text "11" at 373.827,-14.263 h2.65
  text "10" at 423.327,-14.263 h2.65
  text "9" at 472.854,-14.263 h2.65
  text "8" at 522.354,-14.263 h2.65
  text "7" at 571.854,-14.263 h2.65
  text "6" at 621.354,-14.263 h2.65
  text "5" at 670.854,-14.263 h2.65
  text "4" at 720.354,-14.263 h2.65
  text "3" at 769.854,-14.263 h2.65
  text "2" at 819.354,-14.263 h2.65
  text "1" at 868.854,-14.263 h2.65
Board Outline:
  drawing of 1512 lines, arcs and shapes, not listed
  text "BODY ENCLOSURE" at 635.109,390.482 h4.23
  text "87,8" at 608.403,379.215 h2.5
  text "87,8" at 356.659,378.526 h2.5
  text "PCB A" at 480.962,377.622 h3.5
  text "PCB O1" at 499.731,377.622 h3.5
  text "PCB O2" at 521.212,366.436 h3.5
  text "PCB B" at 522.804,341.953 h3.5
  text "3" at 859.682,341.137 h3.5
  text "90,5" at 671.05,317.502 h2.5 r90
  text "PCB C" at 522.247,316.953 h3.5
  text "90,5" at 421.318,316.814 h2.5 r90
  text "21,7" at 439.318,316.814 h2.5 r90
  text "77,4" at 428.418,310.234 h2.5 r90
  text "7" at 511.39,289.501 h2.5
  text "32,8" at 433.318,287.96 h2.5 r90
  text "1" at 866.158,283.479 h3.5
  text "13,2" at 440.418,278.137 h2.5 r90
  text "5,4" at 504.843,271.342 h2.5
  text "28,5" at 475.307,266.676 h2.5
  text "4" at 460.288,261.216 h2.5
  text "2" at 881.6,256.206 h3.5
  text "A-A" at 494.205,254.606 h4.23
  text "SECTION" at 477.908,254.08 h3.7
  text "62" at 662.32,227.558 h2.5 r90
  text "62" at 410.576,217.649 h2.5 r90
  text "HOOK" at 820.353,187.982 h4.23
  text "BASE" at 650.784,187.498 h4.23
  text "84,8" at 607.956,164.041 h2.5
  text "36,5" at 805.306,163.099 h2.5
  text "28,7" at 842.821,132.306 h2.5 r90
  text "86,9" at 687.646,102.835 h2.5 r90
  text "5,2" at 833.574,69.098 h2.5 r90
  text "RIF." at 771.319,55.443 h2.12
  text "Q.TY" at 780.514,55.443 h2.12
  text "DRAWING" at 791.669,55.443 h2.12
  text "DESCRIPTION" at 839.709,55.443 h2.12
  text "1" at 772.787,50.218 h2.12
  text "1" at 782.787,50.218 h2.12
  text "2_250_03678" at 790.12,50.218 h2.12
  text "\XTS - 5M" at 809.069,50.218 h2.12
  text "2" at 772.787,45.218 h2.12
  text "1" at 782.787,45.218 h2.12
  text "2_250_00072" at 790.12,45.218 h2.12
  text "HOOK FOR MODULBOX XT-XTS" at 809.069,45.218 h2.12
  text "3" at 772.787,40.001 h2.12
  text "1" at 782.787,40.001 h2.12
  text "2_250_03674" at 790.12,40.001 h2.12
  text "BODY MODULBOX XTS 5M53-C" at 809.069,40.001 h2.12
  text "General Tolerance UNI EN 22768/1 Media (m)" at 818.356,35.529 h1.59
  text "Sheet:" at 869.63,35.43 h1.59
  text "from 0.5 to 3" at 778.554,31.821 h1.59
  text "from 3 to 6" at 798.591,31.821 h1.59
  text "from 6 to 30" at 818.574,31.821 h1.59
  text "from 30 to 120" at 838.54,31.821 h1.59
  text "from 120 to 400" at 858.523,31.821 h1.59
  text "1" at 878.609,30.271 h2.12
  text "10,3" at 661.816,30.258 h2.5 r90
  text "± 0.1" at 778.587,28.811 h1.59
  text "± 0.1" at 798.587,28.811 h1.59
  text "± 0.2" at 818.587,28.811 h1.59
  text "± 0.3" at 838.587,28.811 h1.59
  text "± 0.5" at 858.587,28.811 h1.59
  text "Scale:" at 769.63,25.43 h1.59
  text "IM:" at 779.686,25.43 h1.59
  text "Drawed:" at 789.63,25.43 h1.59
  text "Checked:" at 809.63,25.43 h1.59
  text "Date:" at 829.63,25.43 h1.59
  text "Material:" at 849.63,25.43 h1.59
  text "Process:" at 869.63,25.43 h1.59
  text "1:1" at 773.535,20.231 h2.12
  text "--" at 783.448,20.191 h2.12
  text "R.N." at 818.529,20.146 h2.12
  text "03/05/2023" at 838.416,20.146 h2.12
  text "The present drawing cannot be" at 798.547,15.565 h0.79
  text "Replaces the:" at 809.63,15.43 h1.59
  text "Derived from:" at 829.63,15.43 h1.59
  text "Weight:" at 849.63,15.43 h1.59
  text "Cod. Mold:" at 869.63,15.43 h1.59
  text "reproduced or comunicated to 3d" at 798.56,14.107 h0.79
  text "parties, even partially, without the" at 798.56,12.648 h0.79
  text "authorization of  ITALTRONIC Srl." at 798.591,11.19 h0.79
  text "M-04093-01" at 818.397,10.271 h2.12
  text "gr" at 859.016,10.271 h2.12
  text "--" at 878.62,10.271 h2.12
  text "Italtronic reserves to protect its" at 798.579,9.732 h0.79
  text "Dimension in mm" at 778.546,8.93 h1.59
  text "own rights according to the law." at 798.546,8.273 h0.79
  text "Description:" at 809.63,5.43 h1.59
  text "KIT CONTENITORE MODULBOX XTS 5M53-C" at 809.63,2.047 h1.59
  text "KIT ENCLOSURE MODULBOX XTS 5M53-C" at 809.63,-0.953 h1.59
  text "Drawing nr.:" at 809.63,-4.57 h1.59
  text "Rev.:" at 869.63,-4.57 h1.59
  text "3_250_00098" at 809.63,-7.807 h3.7
  text "00" at 873.556,-7.807 h3.7
  text "A2" at 883.443,-7.807 h3.7
  text "i t a l t r o n i c . c o m" at 788.594,-8.428 h2
Mechanical 3:
  drawing of 295 lines, arcs and shapes, not listed
  text "Layer" at 85.607,92.329 h1.52
  text "Name" at 96.018,92.329 h1.52
  text "Material" at 119.634,92.329 h1.52
  text "Thickness" at 141.472,92.329 h1.52
  text "Constant" at 157.978,92.329 h1.52
  text "Board Layer Stack" at 172.452,92.329 h1.52
  text "Top Overlay" at 96.018,89.281 h1.52
  text "Top Solder" at 96.018,86.233 h1.52
  text "Solder Resist" at 119.634,86.233 h1.52
  text "0.010mm" at 141.472,86.233 h1.52
  text "3.5" at 157.978,86.233 h1.52
  text "1" at 85.607,83.185 h1.52
  text "Top Layer" at 96.018,83.185 h1.52
  text "0.036mm" at 141.472,83.185 h1.52
  text "Dielectric 2" at 96.018,80.137 h1.52
  text "PP-006" at 119.634,80.137 h1.52
  text "0.071mm" at 141.472,80.137 h1.52
  text "4.1" at 157.978,80.137 h1.52
  text "2" at 85.607,77.089 h1.52
  text "GND1" at 96.018,77.089 h1.52
  text "CF-004" at 119.634,77.089 h1.52
  text "0.035mm" at 141.472,77.089 h1.52
  text "Dielectric 1" at 96.018,74.041 h1.52
  text "FR-4" at 119.634,74.041 h1.52
  text "0.320mm" at 141.472,74.041 h1.52
  text "4.8" at 157.978,74.041 h1.52
  text "3" at 85.607,70.993 h1.52
  text "GND2" at 96.018,70.993 h1.52
  text "CF-004" at 119.634,70.993 h1.52
  text "0.035mm" at 141.472,70.993 h1.52
  text "Dielectric 3" at 96.018,67.945 h1.52
  text "PP-006" at 119.634,67.945 h1.52
  text "0.071mm" at 141.472,67.945 h1.52
  text "4.1" at 157.978,67.945 h1.52
  text "4" at 85.607,64.897 h1.52
  text "Bottom Layer" at 96.018,64.897 h1.52
  text "0.036mm" at 141.472,64.897 h1.52
  text "Bottom Solder" at 96.018,61.849 h1.52
  text "Solder Resist" at 119.634,61.849 h1.52
  text "0.010mm" at 141.472,61.849 h1.52
  text "3.5" at 157.978,61.849 h1.52
  text "Bottom Overlay" at 96.018,58.801 h1.52
  text "Total board thickness:" at 85.607,55.753 h1.52
  text "0.624mm" at 141.472,55.753 h1.52
Mechanical 4:
  circle w0.013: c641.217,265.057 r2
  circle w0.013: c524.673,265.057 r2
  circle w0.013: c610.533,52.099 r2
  circle w0.013: c668.113,52.187 r2
  lines w0.013: 522.673,265.057 526.673,265.057 ; 524.673,263.057 524.673,267.057 ; 608.533,52.099 612.533,52.099 ; 610.533,50.099 610.533,54.099 ; 639.217,265.057 643.217,265.057 ; 641.217,263.057 641.217,267.057 ; 666.113,52.187 670.113,52.187 ; 668.113,50.187 668.113,54.187
  text "FID1" at 3.548,80.856 h1
Mechanical 6:
  the board outline again, w0.254
Drill Drawing:
  circle w0.254: c5.02,133.219 r0.847
  lines w0.254: 4.173,118.825 5.866,118.825 5.02,117.132 4.173,118.825 ; 4.173,120.942 5.02,121.365 5.866,120.942 5.443,121.789 5.866,122.635 5.02,122.212 4.173,122.635 4.596,121.789 4.173,120.942 ; 4.173,124.752 4.173,125.175 4.596,125.599 4.173,126.022 4.173,126.445 4.596,126.445 5.02,126.022 5.443,126.445 5.866,126.445 5.866,126.022 5.443,125.599 5.866,125.175 5.866,124.752 5.443,124.752 5.02,125.175 4.596,124.752 4.173,124.752 ; 4.173,128.562 5.866,128.562 5.866,130.255 4.173,130.255 4.173,128.562 ; 4.173,137.029 5.02,136.182 5.866,137.029 5.02,137.875 4.173,137.029 ; 4.173,140.415 4.596,140.415 5.02,139.992 5.443,140.415 5.866,140.415 5.443,140.839 5.866,141.262 5.443,141.262 5.02,141.685 4.596,141.262 4.173,141.262 4.596,140.839 4.173,140.415
  lines w0.381: 2.654,115.989 282.586,115.989 ; 2.654,142.659 282.586,142.659 ; 16.647,112.179 16.647,146.469 ; 31.629,112.179 31.629,146.469 ; 59.56,112.179 59.56,146.469 ; 72.41,112.179 72.41,146.469 ; 91.048,112.179 91.048,146.469 ; 129.137,112.179 129.137,146.469 ; 144.119,112.179 144.119,146.469 ; 163.062,112.179 163.062,146.469 ; 192.01,112.179 192.01,146.469 ; 213.695,112.179 213.695,146.469 ; 247.569,112.179 247.569,146.469 ; 2.654,112.179 282.586,112.179 282.586,146.469 2.654,146.469 2.654,112.179
  text "Symbol" at 4.94,143.802 h1.83
  text "Count" at 17.79,143.802 h1.83
  text "Hole Size" at 32.772,143.802 h1.83
  text "Plated" at 60.703,143.802 h1.83
  text "Hole Type" at 73.553,143.802 h1.83
  text "Drill Layer Pair" at 92.191,143.802 h1.83
  text "Via/Pad" at 130.28,143.802 h1.83
  text "Pad Shape" at 145.262,143.802 h1.83
  text "Template" at 164.205,143.802 h1.83
  text "Description" at 193.153,143.802 h1.83
  text "Hole Tolerance (+)" at 214.838,143.802 h1.83
  text "Hole Tolerance (-)" at 248.712,143.802 h1.83
  text "4" at 17.79,139.992 h1.52
  text "35.43mil (0.900mm)" at 32.772,139.992 h1.52
  text "PTH" at 60.703,139.992 h1.52
  text "Round" at 73.553,139.992 h1.52
  text "Top Layer - Bottom Layer" at 92.191,139.992 h1.52
  text "Pad" at 130.28,139.992 h1.52
  text "Rounded" at 145.262,139.992 h1.52
  text "c180h90m190mx190p0" at 164.205,139.992 h1.52
  text "4" at 17.79,136.182 h1.52
  text "53.15mil (1.350mm)" at 32.772,136.182 h1.52
  text "PTH" at 60.703,136.182 h1.52
  text "Round" at 73.553,136.182 h1.52
  text "Top Layer - Bottom Layer" at 92.191,136.182 h1.52
  text "Pad" at 130.28,136.182 h1.52
  text "(Mixed)" at 145.262,136.182 h1.52
  text "(Mixed)" at 164.205,136.182 h1.52
  text "10" at 17.79,132.372 h1.52
  text "19.69mil (0.500mm)" at 32.772,132.372 h1.52
  text "PTH" at 60.703,132.372 h1.52
  text "Round" at 73.553,132.372 h1.52
  text "Top Layer - Bottom Layer" at 92.191,132.372 h1.52
  text "Via" at 130.28,132.372 h1.52
  text "Rounded" at 145.262,132.372 h1.52
  text "(Mixed)" at 164.205,132.372 h1.52
  text "12" at 17.79,128.562 h1.52
  text "39.37mil (1.000mm)" at 32.772,128.562 h1.52
  text "PTH" at 60.703,128.562 h1.52
  text "Round" at 73.553,128.562 h1.52
  text "Top Layer - Bottom Layer" at 92.191,128.562 h1.52
  text "Pad" at 130.28,128.562 h1.52
  text "(Mixed)" at 145.262,128.562 h1.52
  text "(Mixed)" at 164.205,128.562 h1.52
  text "16" at 17.79,124.752 h1.52
  text "28.00mil (0.711mm)" at 32.772,124.752 h1.52
  text "PTH" at 60.703,124.752 h1.52
  text "Round" at 73.553,124.752 h1.52
  text "Top Layer - Bottom Layer" at 92.191,124.752 h1.52
  text "Pad" at 130.28,124.752 h1.52
  text "Rounded" at 145.262,124.752 h1.52
  text "c107h71m122" at 164.205,124.752 h1.52
  text "16" at 17.79,120.942 h1.52
  text "55.12mil (1.400mm)" at 32.772,120.942 h1.52
  text "PTH" at 60.703,120.942 h1.52
  text "Round" at 73.553,120.942 h1.52
  text "Top Layer - Bottom Layer" at 92.191,120.942 h1.52
  text "Pad" at 130.28,120.942 h1.52
  text "Rounded" at 145.262,120.942 h1.52
  text "(Mixed)" at 164.205,120.942 h1.52
  text "113" at 17.79,117.132 h1.52
  text "11.81mil (0.300mm)" at 32.772,117.132 h1.52
  text "PTH" at 60.703,117.132 h1.52
  text "Round" at 73.553,117.132 h1.52
  text "Top Layer - Bottom Layer" at 92.191,117.132 h1.52
  text "Via" at 130.28,117.132 h1.52
  text "Rounded" at 145.262,117.132 h1.52
  text "v60h30m0mx0" at 164.205,117.132 h1.52
  text "175 Total" at 17.79,113.322 h1.52

## Dimensions
64.6,83.5 to 0,83.5 on Dimensions
64.6,83.5 to 64.6,0 on Dimensions